# Altium PCB PCB1.PcbDoc (part 6 of 8)
Units mil, origin at the board's own origin, x right, y up, seen from the top; angles counter-clockwise.
Board outline 1968.5 x 1968.5 mil, 4 copper layers (Top Layer, Layer 1, Layer 2, Bottom Layer), stack 23.756 mil thick; 223 components, 143 nets, 652 pads, 329 vias.
Unrouted connection lines stored in the file: 15.
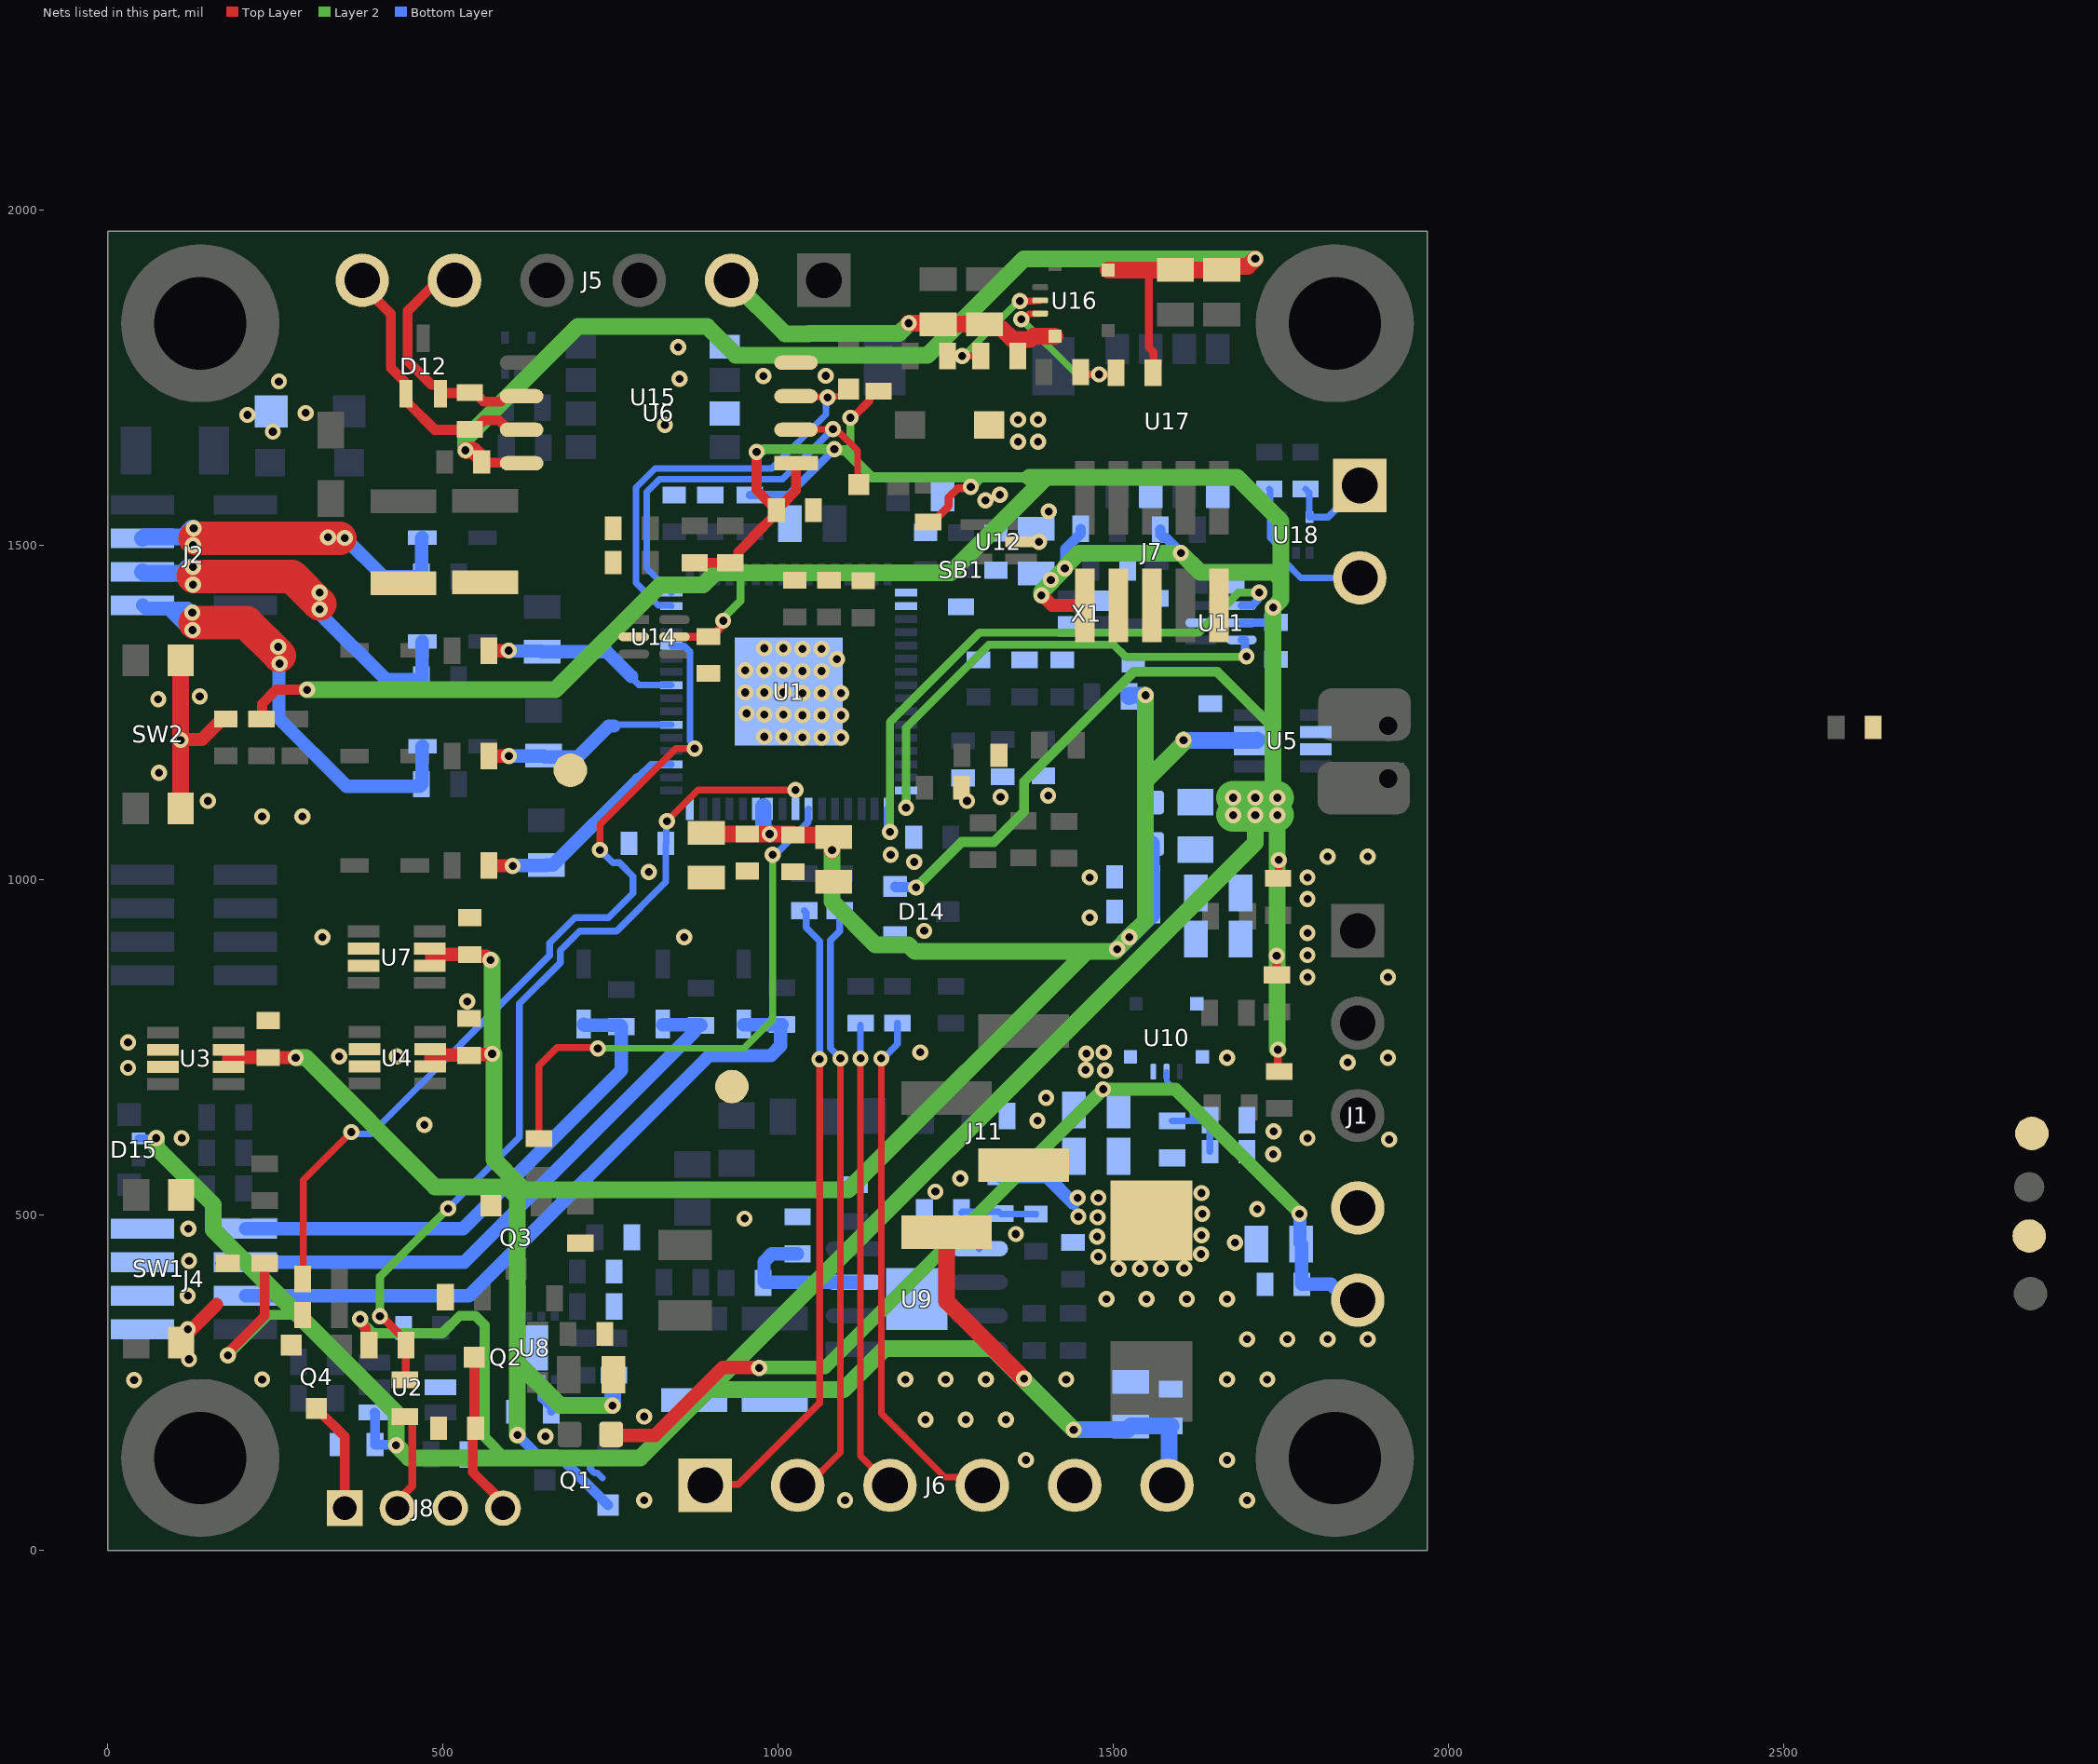
[diagram p4: the nets of this part, all layers, seen from the top]

## Part data (continued)
R47 R48 R49: library part RK73H1JTTD1000F, "Res Thick Film 0603 100 Ohm 1% 0.125W(1/8W) ±100ppm/C Pad SMD Automotive T/R", Arrow Part Number=SR0603FR-7T10KL, Case Code (Imperial)=0603, Case Code (Metric)=1608, Manufacturer="Yageo Group", Manufacturer Lifecycle Status=ACTIVE, Max Operating Temperature=155°C, Max Voltage Rating (DC)=100V, Min Operating Temperature=-55°C, Mouser Part Number=603-SR0603FR-7T10KL, Power Rating=250mW, Ratings=AEC-Q200, Supplier Part Number=YAG5823CT-ND, Temperature Coefficient=100ppm/°C, Tolerance=1%, Voltage Rating=75V, Voltage Rating (DC)=50V, Working Voltage=150V, Arrow Price/Stock=https://www.arrow.com/en/products/sr0603fr-7t10kl/yageo, Case/Package=0603, Category="Chip SMD Resistors", China RoHS=Non-Compliant, ComponentLink1Description=https://datasheet.octopart.com:443/SR0603FR-7T10KL-Yageo-datasheet-176402240.pdf?src-supplier=Farnell, ComponentLink1URL=https://datasheet.octopart.com:443/SR0603FR-7T10KL-Yageo-datasheet-176402240.pdf?src-supplier=Farnell, ComponentLink2Description=https://datasheet.octopart.com:443/SR0603FR-7T10KL-Yageo-datasheet-119732217.pdf?src-supplier=Upverter, ComponentLink2URL=https://datasheet.octopart.com:443/SR0603FR-7T10KL-Yageo-datasheet-119732217.pdf?src-supplier=Upverter, ComponentLink3Description=https://datasheet.octopart.com:443/SR0603FR-7T10KL-Yageo-Group-datasheet-184785656.pdf?src-supplier=Future+Electronics, ComponentLink3URL=https://datasheet.octopart.com:443/SR0603FR-7T10KL-Yageo-Group-datasheet-184785656.pdf?src-supplier=Future+Electronics, ComponentLink4Description=https://datasheet.octopart.com:443/SR0603FR-7T10KL-Yageo-datasheet-155675517.pdf?src-supplier=Future+Electronics, ComponentLink4URL=https://datasheet.octopart.com:443/SR0603FR-7T10KL-Yageo-datasheet-155675517.pdf?src-supplier=Future+Electronics, ComponentLink5Description=https://datasheet.octopart.com:443/SR0603FR-7T10KL-Yageo-datasheet-137701088.pdf?src-supplier=Future+Electronics, ComponentLink5URL=https://datasheet.octopart.com:443/SR0603FR-7T10KL-Yageo-datasheet-137701088.pdf?src-supplier=Future+Electronics, ComponentLink6Description=https://datasheet.octopart.com/SR0603FR-7T10KL-Yageo-datasheet-11047080.pdf, ComponentLink6URL=https://datasheet.octopart.com/SR0603FR-7T10KL-Yageo-datasheet-11047080.pdf, ComponentLink7Description=http://sigma.octopart.com:80/conflict_mineral_statement/Yageo-company-3.pdf?src-supplier=Compliance+Statements, ComponentLink7URL=http://sigma.octopart.com:80/conflict_mineral_statement/Yageo-company-3.pdf?src-supplier=Compliance+Statements, ComponentLink8Description=http://sigma.octopart.com:80/rohs_statement/Yageo-company-2.pdf?src-supplier=Compliance+Statements, ComponentLink8URL=http://sigma.octopart.com:80/rohs_statement/Yageo-company-2.pdf?src-supplier=Compliance+Statements, ComponentLink9Description=https://datasheet.octopart.com:443/SR0603FR-7T4R7L-Yageo-datasheet-176402240.pdf?src-supplier=Farnell, ComponentLink9URL=https://datasheet.octopart.com:443/SR0603FR-7T4R7L-Yageo-datasheet-176402240.pdf?src-supplier=Farnell, ComponentLink10Description=https://datasheet.octopart.com:443/SR0603FR-7T4R7L-Yageo-datasheet-119732217.pdf?src-supplier=Upverter, ComponentLink10URL=https://datasheet.octopart.com:443/SR0603FR-7T4R7L-Yageo-datasheet-119732217.pdf?src-supplier=Upverter, ComponentLink11Description=https://datasheet.octopart.com:443/SR0603FR-7T4R7L-Yageo-Group-datasheet-184785656.pdf?src-supplier=Future+Electronics, ComponentLink11URL=https://datasheet.octopart.com:443/SR0603FR-7T4R7L-Yageo-Group-datasheet-184785656.pdf?src-supplier=Future+Electronics, ComponentLink12Description=https://datasheet.octopart.com:443/SR0603FR-7T4R7L-Yageo-datasheet-155675517.pdf?src-supplier=Future+Electronics, ComponentLink12URL=https://datasheet.octopart.com:443/SR0603FR-7T4R7L-Yageo-datasheet-155675517.pdf?src-supplier=Future+Electronics, ComponentLink13Description=https://datasheet.octopart.com:443/SR0603FR-7T4R7L-Yageo-datasheet-137701088.pdf?src-supplier=Future+Electronics, ComponentLink13URL=https://datasheet.octopart.com:443/SR0603FR-7T4R7L-Yageo-datasheet-137701088.pdf?src-supplier=Future+Electronics, ComponentLink14Description=https://datasheet.octopart.com/SR0603FR-7T4R7L-Yageo-datasheet-11047080.pdf, ComponentLink14URL=https://datasheet.octopart.com/SR0603FR-7T4R7L-Yageo-datasheet-11047080.pdf, ComponentLink15Description=https://datasheet.octopart.com:443/SR0603FR-7T100KL-Yageo-datasheet-176402240.pdf?src-supplier=element14+APAC, ComponentLink15URL=https://datasheet.octopart.com:443/SR0603FR-7T100KL-Yageo-datasheet-176402240.pdf?src-supplier=element14+APAC, ComponentLink16Description=https://datasheet.octopart.com:443/SR0603FR-7T100KL-Yageo-datasheet-119732217.pdf?src-supplier=Upverter, ComponentLink16URL=https://datasheet.octopart.com:443/SR0603FR-7T100KL-Yageo-datasheet-119732217.pdf?src-supplier=Upverter, ComponentLink17Description=https://datasheet.octopart.com:443/SR0603FR-7T100KL-Yageo-Group-datasheet-184785656.pdf?src-supplier=Future+Electronics, ComponentLink17URL=https://datasheet.octopart.com:443/SR0603FR-7T100KL-Yageo-Group-datasheet-184785656.pdf?src-supplier=Future+Electronics, ComponentLink18Description=https://datasheet.octopart.com:443/SR0603FR-7T100KL-Yageo-datasheet-155675517.pdf?src-supplier=Future+Electronics, ComponentLink18URL=https://datasheet.octopart.com:443/SR0603FR-7T100KL-Yageo-datasheet-155675517.pdf?src-supplier=Future+Electronics, ComponentLink19Description=https://datasheet.octopart.com:443/SR0603FR-7T100KL-Yageo-datasheet-137701088.pdf?src-supplier=Future+Electronics, ComponentLink19URL=https://datasheet.octopart.com:443/SR0603FR-7T100KL-Yageo-datasheet-137701088.pdf?src-supplier=Future+Electronics, ComponentLink20Description=https://datasheet.octopart.com/SR0603FR-7T100KL-Yageo-datasheet-11047080.pdf, ComponentLink20URL=https://datasheet.octopart.com/SR0603FR-7T100KL-Yageo-datasheet-11047080.pdf, ComponentLink21Description=https://datasheet.octopart.com:443/RS73F1JTTD2001B-KOA-Speer-datasheet-182143723.pdf?src-supplier=IHS, ComponentLink21URL=https://datasheet.octopart.com:443/RS73F1JTTD2001B-KOA-Speer-datasheet-182143723.pdf?src-supplier=IHS, ComponentLink22Description=https://datasheet.octopart.com:443/RS73F1JTTD2001B-KOA-Speer-datasheet-141350738.pdf?src-supplier=KOA+Speer+SCT, ComponentLink22URL=https://datasheet.octopart.com:443/RS73F1JTTD2001B-KOA-Speer-datasheet-141350738.pdf?src-supplier=KOA+Speer+SCT, ComponentLink23Description=https://sigma.octopart.com:443/141350679/technical_drawing/KOA-Speer-RS73F1JTTD2001B.pdf?src-supplier=KOA+Speer+SCT, ComponentLink23URL=https://sigma.octopart.com:443/141350679/technical_drawing/KOA-Speer-RS73F1JTTD2001B.pdf?src-supplier=KOA+Speer+SCT, ComponentLink24Description=http://sigma.octopart.com:80/rohs_statement/KOA-Speer-company-17.pdf?src-supplier=Compliance+Statements, ComponentLink24URL=http://sigma.octopart.com:80/rohs_statement/KOA-Speer-company-17.pdf?src-supplier=Compliance+Statements, ComponentLink25Description=https://datasheet.octopart.com:443/ERJH3EF2201V-Panasonic-datasheet-182147299.pdf?src-supplier=IHS, ComponentLink25URL=https://datasheet.octopart.com:443/ERJH3EF2201V-Panasonic-datasheet-182147299.pdf?src-supplier=IHS, ComponentLink26Description=https://datasheet.octopart.com:443/ERJH3EF2201V-Panasonic-datasheet-150823776.pdf?src-supplier=Panasonic, ComponentLink26URL=https://datasheet.octopart.com:443/ERJH3EF2201V-Panasonic-datasheet-150823776.pdf?src-supplier=Panasonic, ComponentLink27Description=https://datasheet.octopart.com:443/ERJH3EF2201V-Panasonic-datasheet-165581513.pdf?src-supplier=TME, ComponentLink27URL=https://datasheet.octopart.com:443/ERJH3EF2201V-Panasonic-datasheet-165581513.pdf?src-supplier=TME, ComponentLink28Description=https://datasheet.octopart.com:443/RK73H1JTTD1000F-KOA-Speer-datasheet-181956035.pdf?src-supplier=IHS, ComponentLink28URL=https://datasheet.octopart.com:443/RK73H1JTTD1000F-KOA-Speer-datasheet-181956035.pdf?src-supplier=IHS, ComponentLink29Description=https://datasheet.octopart.com/RK73H1JTTD1000F-KOA-Speer-datasheet-11590619.pdf, ComponentLink29URL=https://datasheet.octopart.com/RK73H1JTTD1000F-KOA-Speer-datasheet-11590619.pdf, ComponentLink30Description=https://sigma.octopart.com:443/138820520/technical_drawing/KOA-Speer-RK73H1JTTD1000F.pdf?src-supplier=Upverter, ComponentLink30URL=https://sigma.octopart.com:443/138820520/technical_drawing/KOA-Speer-RK73H1JTTD1000F.pdf?src-supplier=Upverter, ComponentLink31Description=https://datasheet.octopart.com:443/RK73H1JTTD1000F-KOA-Speer-datasheet-141253609.pdf?src-supplier=Upverter, ComponentLink31URL=https://datasheet.octopart.com:443/RK73H1JTTD1000F-KOA-Speer-datasheet-141253609.pdf?src-supplier=Upverter, ComponentLink32Description=https://datasheet.octopart.com:443/RK73H1JTTD1000F-KOA-Speer-datasheet-141913736.pdf?src-supplier=Upverter, ComponentLink32URL=https://datasheet.octopart.com:443/RK73H1JTTD1000F-KOA-Speer-datasheet-141913736.pdf?src-supplier=Upverter, ComponentLink33Description=https://datasheet.octopart.com:443/RK73H1JTTD1000F-KOA-Speer-datasheet-149653815.pdf?src-supplier=Farnell, ComponentLink33URL=https://datasheet.octopart.com:443/RK73H1JTTD1000F-KOA-Speer-datasheet-149653815.pdf?src-supplier=Farnell, ComponentLink34Description=https://datasheet.octopart.com:443/RK73H1JTTD1000F-KOA-Speer-datasheet-188906116.pdf?src-supplier=TME, ComponentLink34URL=https://datasheet.octopart.com:443/RK73H1JTTD1000F-KOA-Speer-datasheet-188906116.pdf?src-supplier=TME, ComponentLink35Description=https://datasheet.octopart.com:443/RK73H1JTTD1000F-KOA-Speer-datasheet-155997623.pdf?src-supplier=Future+Electronics, ComponentLink35URL=https://datasheet.octopart.com:443/RK73H1JTTD1000F-KOA-Speer-datasheet-155997623.pdf?src-supplier=Future+Electronics, ComponentLink36Description=https://datasheet.octopart.com:443/RK73H1JTTD1000F-KOA-Speer-datasheet-11541643.pdf?src-supplier=Arrow+Electronics, ComponentLink36URL=https://datasheet.octopart.com:443/RK73H1JTTD1000F-KOA-Speer-datasheet-11541643.pdf?src-supplier=Arrow+Electronics, ComponentLink37Description=https://datasheet.octopart.com:443/RK73H1JTTD1000F-KOA-Speer-datasheet-10854116.pdf?src-supplier=element14+APAC, ComponentLink37URL=https://datasheet.octopart.com:443/RK73H1JTTD1000F-KOA-Speer-datasheet-10854116.pdf?src-supplier=element14+APAC, ComponentLink38Description=https://datasheet.octopart.com:443/RK73H1JTTD1000F-KOA-Speer-datasheet-5377369.pdf?src-supplier=Garrett, ComponentLink38URL=https://datasheet.octopart.com:443/RK73H1JTTD1000F-KOA-Speer-datasheet-5377369.pdf?src-supplier=Garrett, ComponentLink39Description=https://datasheet.octopart.com:443/RK73H1JTTD1000F-KOA-Speer-datasheet-5377256.pdf?src-supplier=Garrett, ComponentLink39URL=https://datasheet.octopart.com:443/RK73H1JTTD1000F-KOA-Speer-datasheet-5377256.pdf?src-supplier=Garrett, ComponentLink40Description=https://datasheet.octopart.com:443/RK73H1JTTD1000F-KOA-Speer-datasheet-109233.pdf?src-supplier=Garrett, ComponentLink40URL=https://datasheet.octopart.com:443/RK73H1JTTD1000F-KOA-Speer-datasheet-109233.pdf?src-supplier=Garrett, Composition="Thick Film", Country of Origin="Mainland China, Taiwan", Datasheet Link=https://mouser.componentsearchengine.com/Datasheets/1/SR0603FR-7T10KL.pdf, Depth=800µm, Export Control Classification Number (ECCN) Code=EAR99, Harmonized Tariff Schedule (HTS) Code=8533.21.00.30, Height=0.55mm, Introduction Date=2017-10-02, Lead Free="Lead Free", Length=1.6mm, Lifecycle Status=Production, Manufacturer Part Number=SR0603FR-7T10KL, Manufacturer_Name="Yageo Group", Manufacturer_Part_Number=SR0603FR-7T10KL, Military Standard=Not, Mounting Technology="Surface Mount", Mouser Price/Stock=https://www.mouser.co.uk/ProductDetail/YAGEO/SR0603FR-7T10KL?qs=pfd5qewlna6IurLw3u3uRA%3D%3D, Number of Terminals=2, Packaging="Tape & Reel", Part Series="High Temperature Chip Resistors", Pins=2, Pricing="1=0,67, 10=0,399, 25=0,3376, 50=0,3022, 100=0,2744, 250=0,24612, 500=0,22976, 1000=0,21675 (USD)", REACH SVHC=Yes, RoHS=Compliant, Schedule B="8533210045, 8533210045|8533210045|8533210045|8533210045|8533210045", Stock=5000, Supplier=DigiKey, Termination=SMD/SMT, Width=800µm
R50 R51 R52 R53: library part RK73H1JTTD33R0F, "Res Thick Film 0603 33 Ohm 1% 0.125W(1/8W) ±100ppm/C Pad SMD Automotive T/R", Arrow Part Number=SR0603FR-7T10KL, Case Code (Imperial)=0603, Case Code (Metric)=1608, Manufacturer="Yageo Group", Max Operating Temperature=155°C, Min Operating Temperature=-55°C, Mouser Part Number=603-SR0603FR-7T10KL, Power Rating=250mW, Ratings=AEC-Q200, Supplier Part Number=YAG5823CT-ND, Temperature Coefficient=100ppm/°C, Tolerance=1%, Voltage Rating=75V, Voltage Rating (DC)=50V, Working Voltage=150V, Arrow Price/Stock=https://www.arrow.com/en/products/sr0603fr-7t10kl/yageo, Case/Package=0603, Category="Chip SMD Resistors", China RoHS=Non-Compliant, ComponentLink1Description=https://datasheet.octopart.com:443/SR0603FR-7T10KL-Yageo-datasheet-176402240.pdf?src-supplier=Farnell, ComponentLink1URL=https://datasheet.octopart.com:443/SR0603FR-7T10KL-Yageo-datasheet-176402240.pdf?src-supplier=Farnell, ComponentLink2Description=https://datasheet.octopart.com:443/SR0603FR-7T10KL-Yageo-datasheet-119732217.pdf?src-supplier=Upverter, ComponentLink2URL=https://datasheet.octopart.com:443/SR0603FR-7T10KL-Yageo-datasheet-119732217.pdf?src-supplier=Upverter, ComponentLink3Description=https://datasheet.octopart.com:443/SR0603FR-7T10KL-Yageo-Group-datasheet-184785656.pdf?src-supplier=Future+Electronics, ComponentLink3URL=https://datasheet.octopart.com:443/SR0603FR-7T10KL-Yageo-Group-datasheet-184785656.pdf?src-supplier=Future+Electronics, ComponentLink4Description=https://datasheet.octopart.com:443/SR0603FR-7T10KL-Yageo-datasheet-155675517.pdf?src-supplier=Future+Electronics, ComponentLink4URL=https://datasheet.octopart.com:443/SR0603FR-7T10KL-Yageo-datasheet-155675517.pdf?src-supplier=Future+Electronics, ComponentLink5Description=https://datasheet.octopart.com:443/SR0603FR-7T10KL-Yageo-datasheet-137701088.pdf?src-supplier=Future+Electronics, ComponentLink5URL=https://datasheet.octopart.com:443/SR0603FR-7T10KL-Yageo-datasheet-137701088.pdf?src-supplier=Future+Electronics, ComponentLink6Description=https://datasheet.octopart.com/SR0603FR-7T10KL-Yageo-datasheet-11047080.pdf, ComponentLink6URL=https://datasheet.octopart.com/SR0603FR-7T10KL-Yageo-datasheet-11047080.pdf, ComponentLink7Description=http://sigma.octopart.com:80/conflict_mineral_statement/Yageo-company-3.pdf?src-supplier=Compliance+Statements, ComponentLink7URL=http://sigma.octopart.com:80/conflict_mineral_statement/Yageo-company-3.pdf?src-supplier=Compliance+Statements, ComponentLink8Description=http://sigma.octopart.com:80/rohs_statement/Yageo-company-2.pdf?src-supplier=Compliance+Statements, ComponentLink8URL=http://sigma.octopart.com:80/rohs_statement/Yageo-company-2.pdf?src-supplier=Compliance+Statements, ComponentLink9Description=https://datasheet.octopart.com:443/SR0603FR-7T4R7L-Yageo-datasheet-176402240.pdf?src-supplier=Farnell, ComponentLink9URL=https://datasheet.octopart.com:443/SR0603FR-7T4R7L-Yageo-datasheet-176402240.pdf?src-supplier=Farnell, ComponentLink10Description=https://datasheet.octopart.com:443/SR0603FR-7T4R7L-Yageo-datasheet-119732217.pdf?src-supplier=Upverter, ComponentLink10URL=https://datasheet.octopart.com:443/SR0603FR-7T4R7L-Yageo-datasheet-119732217.pdf?src-supplier=Upverter, ComponentLink11Description=https://datasheet.octopart.com:443/SR0603FR-7T4R7L-Yageo-Group-datasheet-184785656.pdf?src-supplier=Future+Electronics, ComponentLink11URL=https://datasheet.octopart.com:443/SR0603FR-7T4R7L-Yageo-Group-datasheet-184785656.pdf?src-supplier=Future+Electronics, ComponentLink12Description=https://datasheet.octopart.com:443/SR0603FR-7T4R7L-Yageo-datasheet-155675517.pdf?src-supplier=Future+Electronics, ComponentLink12URL=https://datasheet.octopart.com:443/SR0603FR-7T4R7L-Yageo-datasheet-155675517.pdf?src-supplier=Future+Electronics, ComponentLink13Description=https://datasheet.octopart.com:443/SR0603FR-7T4R7L-Yageo-datasheet-137701088.pdf?src-supplier=Future+Electronics, ComponentLink13URL=https://datasheet.octopart.com:443/SR0603FR-7T4R7L-Yageo-datasheet-137701088.pdf?src-supplier=Future+Electronics, ComponentLink14Description=https://datasheet.octopart.com/SR0603FR-7T4R7L-Yageo-datasheet-11047080.pdf, ComponentLink14URL=https://datasheet.octopart.com/SR0603FR-7T4R7L-Yageo-datasheet-11047080.pdf, ComponentLink15Description=https://datasheet.octopart.com:443/SR0603FR-7T100KL-Yageo-datasheet-176402240.pdf?src-supplier=element14+APAC, ComponentLink15URL=https://datasheet.octopart.com:443/SR0603FR-7T100KL-Yageo-datasheet-176402240.pdf?src-supplier=element14+APAC, ComponentLink16Description=https://datasheet.octopart.com:443/SR0603FR-7T100KL-Yageo-datasheet-119732217.pdf?src-supplier=Upverter, ComponentLink16URL=https://datasheet.octopart.com:443/SR0603FR-7T100KL-Yageo-datasheet-119732217.pdf?src-supplier=Upverter, ComponentLink17Description=https://datasheet.octopart.com:443/SR0603FR-7T100KL-Yageo-Group-datasheet-184785656.pdf?src-supplier=Future+Electronics, ComponentLink17URL=https://datasheet.octopart.com:443/SR0603FR-7T100KL-Yageo-Group-datasheet-184785656.pdf?src-supplier=Future+Electronics, ComponentLink18Description=https://datasheet.octopart.com:443/SR0603FR-7T100KL-Yageo-datasheet-155675517.pdf?src-supplier=Future+Electronics, ComponentLink18URL=https://datasheet.octopart.com:443/SR0603FR-7T100KL-Yageo-datasheet-155675517.pdf?src-supplier=Future+Electronics, ComponentLink19Description=https://datasheet.octopart.com:443/SR0603FR-7T100KL-Yageo-datasheet-137701088.pdf?src-supplier=Future+Electronics, ComponentLink19URL=https://datasheet.octopart.com:443/SR0603FR-7T100KL-Yageo-datasheet-137701088.pdf?src-supplier=Future+Electronics, ComponentLink20Description=https://datasheet.octopart.com/SR0603FR-7T100KL-Yageo-datasheet-11047080.pdf, ComponentLink20URL=https://datasheet.octopart.com/SR0603FR-7T100KL-Yageo-datasheet-11047080.pdf, ComponentLink21Description=https://datasheet.octopart.com:443/RK73H1JTTD1001F-KOA-Speer-datasheet-181956035.pdf?src-supplier=IHS, ComponentLink21URL=https://datasheet.octopart.com:443/RK73H1JTTD1001F-KOA-Speer-datasheet-181956035.pdf?src-supplier=IHS, ComponentLink22Description=https://datasheet.octopart.com/RK73H1JTTD1001F-KOA-Speer-datasheet-11590619.pdf, ComponentLink22URL=https://datasheet.octopart.com/RK73H1JTTD1001F-KOA-Speer-datasheet-11590619.pdf, ComponentLink23Description=https://datasheet.octopart.com:443/RK73H1JTTD1001F-KOA-Speer-datasheet-149653815.pdf?src-supplier=element14+APAC, ComponentLink23URL=https://datasheet.octopart.com:443/RK73H1JTTD1001F-KOA-Speer-datasheet-149653815.pdf?src-supplier=element14+APAC, ComponentLink24Description=https://datasheet.octopart.com:443/RK73H1JTTD1001F-KOA-Speer-datasheet-10854116.pdf?src-supplier=element14+APAC, ComponentLink24URL=https://datasheet.octopart.com:443/RK73H1JTTD1001F-KOA-Speer-datasheet-10854116.pdf?src-supplier=element14+APAC, ComponentLink25Description=https://datasheet.octopart.com:443/RK73H1JTTD1001F-KOA-Speer-datasheet-188906116.pdf?src-supplier=TME, ComponentLink25URL=https://datasheet.octopart.com:443/RK73H1JTTD1001F-KOA-Speer-datasheet-188906116.pdf?src-supplier=TME, ComponentLink26Description=https://datasheet.octopart.com:443/RK73H1JTTD1001F-KOA-Speer-datasheet-155997623.pdf?src-supplier=Future+Electronics, ComponentLink26URL=https://datasheet.octopart.com:443/RK73H1JTTD1001F-KOA-Speer-datasheet-155997623.pdf?src-supplier=Future+Electronics, ComponentLink27Description=https://datasheet.octopart.com:443/RK73H1JTTD1001F-KOA-Speer-datasheet-11541643.pdf?src-supplier=Arrow+Electronics, ComponentLink27URL=https://datasheet.octopart.com:443/RK73H1JTTD1001F-KOA-Speer-datasheet-11541643.pdf?src-supplier=Arrow+Electronics, ComponentLink28Description=https://datasheet.octopart.com:443/RK73H1JTTD1001F-KOA-Speer-datasheet-5377369.pdf?src-supplier=Garrett, ComponentLink28URL=https://datasheet.octopart.com:443/RK73H1JTTD1001F-KOA-Speer-datasheet-5377369.pdf?src-supplier=Garrett, ComponentLink29Description=https://datasheet.octopart.com:443/RK73H1JTTD1001F-KOA-Speer-datasheet-5377256.pdf?src-supplier=Garrett, ComponentLink29URL=https://datasheet.octopart.com:443/RK73H1JTTD1001F-KOA-Speer-datasheet-5377256.pdf?src-supplier=Garrett, ComponentLink30Description=https://datasheet.octopart.com:443/RK73H1JTTD1001F-KOA-Speer-datasheet-109233.pdf?src-supplier=Garrett, ComponentLink30URL=https://datasheet.octopart.com:443/RK73H1JTTD1001F-KOA-Speer-datasheet-109233.pdf?src-supplier=Garrett, ComponentLink31Description=https://datasheet.octopart.com:443/RK73H1JTTD1001F-KOA-Speer-datasheet-5313488.pdf?src-supplier=Verical, ComponentLink31URL=https://datasheet.octopart.com:443/RK73H1JTTD1001F-KOA-Speer-datasheet-5313488.pdf?src-supplier=Verical, ComponentLink32Description=http://sigma.octopart.com:80/rohs_statement/KOA-Speer-company-17.pdf?src-supplier=Compliance+Statements, ComponentLink32URL=http://sigma.octopart.com:80/rohs_statement/KOA-Speer-company-17.pdf?src-supplier=Compliance+Statements, ComponentLink33Description=https://datasheet.octopart.com:443/RK73H1JTTD33R0F-KOA-Speer-datasheet-181956035.pdf?src-supplier=IHS, ComponentLink33URL=https://datasheet.octopart.com:443/RK73H1JTTD33R0F-KOA-Speer-datasheet-181956035.pdf?src-supplier=IHS, ComponentLink34Description=https://datasheet.octopart.com:443/RK73H1JTTD33R0F-KOA-Speer-datasheet-11590619.pdf?src-supplier=Upverter, ComponentLink34URL=https://datasheet.octopart.com:443/RK73H1JTTD33R0F-KOA-Speer-datasheet-11590619.pdf?src-supplier=Upverter, ComponentLink35Description=https://datasheet.octopart.com:443/RK73H1JTTD33R0F-KOA-Speer-datasheet-149653815.pdf?src-supplier=element14+APAC, ComponentLink35URL=https://datasheet.octopart.com:443/RK73H1JTTD33R0F-KOA-Speer-datasheet-149653815.pdf?src-supplier=element14+APAC, ComponentLink36Description=https://datasheet.octopart.com:443/RK73H1JTTD33R0F-KOA-Speer-datasheet-10854116.pdf?src-supplier=element14+APAC, ComponentLink36URL=https://datasheet.octopart.com:443/RK73H1JTTD33R0F-KOA-Speer-datasheet-10854116.pdf?src-supplier=element14+APAC, ComponentLink37Description=https://datasheet.octopart.com:443/RK73H1JTTD33R0F-KOA-Speer-datasheet-188906116.pdf?src-supplier=TME, ComponentLink37URL=https://datasheet.octopart.com:443/RK73H1JTTD33R0F-KOA-Speer-datasheet-188906116.pdf?src-supplier=TME, ComponentLink38Description=https://datasheet.octopart.com:443/RK73H1JTTD33R0F-KOA-Speer-datasheet-164280812.pdf?src-supplier=Future+Electronics, ComponentLink38URL=https://datasheet.octopart.com:443/RK73H1JTTD33R0F-KOA-Speer-datasheet-164280812.pdf?src-supplier=Future+Electronics, Composition="Thick Film", Country of Origin="Mainland China, Taiwan", Datasheet Link=https://mouser.componentsearchengine.com/Datasheets/1/SR0603FR-7T10KL.pdf, Depth=800µm, Export Control Classification Number (ECCN) Code=EAR99, Harmonized Tariff Schedule (HTS) Code=8533.21.00.30, Height=0.55mm, Introduction Date=2017-10-02, Lead Free="Lead Free", Length=1.6mm, Lifecycle Status=Production, Manufacturer Part Number=SR0603FR-7T10KL, Manufacturer_Name="Yageo Group", Manufacturer_Part_Number=SR0603FR-7T10KL, Military Standard=Not, Mounting Technology="Surface Mount", Mouser Price/Stock=https://www.mouser.co.uk/ProductDetail/YAGEO/SR0603FR-7T10KL?qs=pfd5qewlna6IurLw3u3uRA%3D%3D, Number of Terminals=2, Packaging="Tape & Reel", Pins=2, Pricing="1=0,67, 10=0,399, 25=0,3376, 50=0,3022, 100=0,2744, 250=0,24612, 500=0,22976, 1000=0,21675 (USD)", REACH SVHC=Yes, RoHS=Compliant, Schedule B="8533210045, 8533210045|8533210045|8533210045|8533210045|8533210045", Stock=5000, Supplier=DigiKey, Termination=SMD/SMT, Width=800µm
R72 R73 R74 R75: library part ERJ-H3EF1802V, "Fixed Resistor, Metal Glaze/thick Film, 0.125W, 18000ohm, 75V, 1% +/-Tol, 100ppm/Cel, Surface Mount, 0603", Arrow Part Number=SR0603FR-7T10KL, Case Code (Imperial)=0603, Case Code (Metric)=1608, Manufacturer="Yageo Group", Manufacturer Lifecycle Status=ACTIVE, Max Operating Temperature=155°C, Max Power Dissipation=125mW, Max Voltage Rating (DC)=150V, Min Operating Temperature=-55°C, Mouser Part Number=603-SR0603FR-7T10KL, Power Rating=250mW, Ratings=AEC-Q200, Supplier Part Number=YAG5823CT-ND, Temperature Coefficient=100ppm/°C, Tolerance=1%, Voltage Rating=75V, Voltage Rating (DC)=50V, Arrow Price/Stock=https://www.arrow.com/en/products/sr0603fr-7t10kl/yageo, Case/Package=0603, Category="Chip SMD Resistors", China RoHS=Non-Compliant, ComponentLink1Description=https://datasheet.octopart.com:443/SR0603FR-7T10KL-Yageo-datasheet-176402240.pdf?src-supplier=Farnell, ComponentLink1URL=https://datasheet.octopart.com:443/SR0603FR-7T10KL-Yageo-datasheet-176402240.pdf?src-supplier=Farnell, ComponentLink2Description=https://datasheet.octopart.com:443/SR0603FR-7T10KL-Yageo-datasheet-119732217.pdf?src-supplier=Upverter, ComponentLink2URL=https://datasheet.octopart.com:443/SR0603FR-7T10KL-Yageo-datasheet-119732217.pdf?src-supplier=Upverter, ComponentLink3Description=https://datasheet.octopart.com:443/SR0603FR-7T10KL-Yageo-Group-datasheet-184785656.pdf?src-supplier=Future+Electronics, ComponentLink3URL=https://datasheet.octopart.com:443/SR0603FR-7T10KL-Yageo-Group-datasheet-184785656.pdf?src-supplier=Future+Electronics, ComponentLink4Description=https://datasheet.octopart.com:443/SR0603FR-7T10KL-Yageo-datasheet-155675517.pdf?src-supplier=Future+Electronics, ComponentLink4URL=https://datasheet.octopart.com:443/SR0603FR-7T10KL-Yageo-datasheet-155675517.pdf?src-supplier=Future+Electronics, ComponentLink5Description=https://datasheet.octopart.com:443/SR0603FR-7T10KL-Yageo-datasheet-137701088.pdf?src-supplier=Future+Electronics, ComponentLink5URL=https://datasheet.octopart.com:443/SR0603FR-7T10KL-Yageo-datasheet-137701088.pdf?src-supplier=Future+Electronics, ComponentLink6Description=https://datasheet.octopart.com/SR0603FR-7T10KL-Yageo-datasheet-11047080.pdf, ComponentLink6URL=https://datasheet.octopart.com/SR0603FR-7T10KL-Yageo-datasheet-11047080.pdf, ComponentLink7Description=http://sigma.octopart.com:80/conflict_mineral_statement/Yageo-company-3.pdf?src-supplier=Compliance+Statements, ComponentLink7URL=http://sigma.octopart.com:80/conflict_mineral_statement/Yageo-company-3.pdf?src-supplier=Compliance+Statements, ComponentLink8Description=http://sigma.octopart.com:80/rohs_statement/Yageo-company-2.pdf?src-supplier=Compliance+Statements, ComponentLink8URL=http://sigma.octopart.com:80/rohs_statement/Yageo-company-2.pdf?src-supplier=Compliance+Statements, ComponentLink9Description=https://datasheet.octopart.com:443/SR0603FR-7T4R7L-Yageo-datasheet-176402240.pdf?src-supplier=Farnell, ComponentLink9URL=https://datasheet.octopart.com:443/SR0603FR-7T4R7L-Yageo-datasheet-176402240.pdf?src-supplier=Farnell, ComponentLink10Description=https://datasheet.octopart.com:443/SR0603FR-7T4R7L-Yageo-datasheet-119732217.pdf?src-supplier=Upverter, ComponentLink10URL=https://datasheet.octopart.com:443/SR0603FR-7T4R7L-Yageo-datasheet-119732217.pdf?src-supplier=Upverter, ComponentLink11Description=https://datasheet.octopart.com:443/SR0603FR-7T4R7L-Yageo-Group-datasheet-184785656.pdf?src-supplier=Future+Electronics, ComponentLink11URL=https://datasheet.octopart.com:443/SR0603FR-7T4R7L-Yageo-Group-datasheet-184785656.pdf?src-supplier=Future+Electronics, ComponentLink12Description=https://datasheet.octopart.com:443/SR0603FR-7T4R7L-Yageo-datasheet-155675517.pdf?src-supplier=Future+Electronics, ComponentLink12URL=https://datasheet.octopart.com:443/SR0603FR-7T4R7L-Yageo-datasheet-155675517.pdf?src-supplier=Future+Electronics, ComponentLink13Description=https://datasheet.octopart.com:443/SR0603FR-7T4R7L-Yageo-datasheet-137701088.pdf?src-supplier=Future+Electronics, ComponentLink13URL=https://datasheet.octopart.com:443/SR0603FR-7T4R7L-Yageo-datasheet-137701088.pdf?src-supplier=Future+Electronics, ComponentLink14Description=https://datasheet.octopart.com/SR0603FR-7T4R7L-Yageo-datasheet-11047080.pdf, ComponentLink14URL=https://datasheet.octopart.com/SR0603FR-7T4R7L-Yageo-datasheet-11047080.pdf, ComponentLink15Description=https://datasheet.octopart.com:443/SG73G1JTTD5102C-KOA-Speer-datasheet-181956059.pdf?src-supplier=IHS, ComponentLink15URL=https://datasheet.octopart.com:443/SG73G1JTTD5102C-KOA-Speer-datasheet-181956059.pdf?src-supplier=IHS, ComponentLink16Description=https://sigma.octopart.com:443/141350679/technical_drawing/KOA-Speer-SG73G1JTTD5102C.pdf?src-supplier=KOA+Speer+SCT, ComponentLink16URL=https://sigma.octopart.com:443/141350679/technical_drawing/KOA-Speer-SG73G1JTTD5102C.pdf?src-supplier=KOA+Speer+SCT, ComponentLink17Description=https://datasheet.octopart.com:443/SG73G1JTTD5102C-KOA-Speer-datasheet-141350755.pdf?src-supplier=KOA+Speer+SCT, ComponentLink17URL=https://datasheet.octopart.com:443/SG73G1JTTD5102C-KOA-Speer-datasheet-141350755.pdf?src-supplier=KOA+Speer+SCT, ComponentLink18Description=http://sigma.octopart.com:80/rohs_statement/KOA-Speer-company-17.pdf?src-supplier=Compliance+Statements, ComponentLink18URL=http://sigma.octopart.com:80/rohs_statement/KOA-Speer-company-17.pdf?src-supplier=Compliance+Statements, ComponentLink19Description=https://datasheet.octopart.com:443/ESR03EZPD5102-ROHM-datasheet-182147624.pdf?src-supplier=IHS, ComponentLink19URL=https://datasheet.octopart.com:443/ESR03EZPD5102-ROHM-datasheet-182147624.pdf?src-supplier=IHS, ComponentLink20Description=https://datasheet.octopart.com:443/RK73H1JTTD68R0F-KOA-Speer-datasheet-181956035.pdf?src-supplier=IHS, ComponentLink20URL=https://datasheet.octopart.com:443/RK73H1JTTD68R0F-KOA-Speer-datasheet-181956035.pdf?src-supplier=IHS, ComponentLink21Description=https://datasheet.octopart.com:443/RK73H1JTTD68R0F-KOA-Speer-datasheet-11590619.pdf?src-supplier=Upverter, ComponentLink21URL=https://datasheet.octopart.com:443/RK73H1JTTD68R0F-KOA-Speer-datasheet-11590619.pdf?src-supplier=Upverter, ComponentLink22Description=https://datasheet.octopart.com:443/RK73H1JTTD68R0F-KOA-Speer-datasheet-149653815.pdf?src-supplier=Newark, ComponentLink22URL=https://datasheet.octopart.com:443/RK73H1JTTD68R0F-KOA-Speer-datasheet-149653815.pdf?src-supplier=Newark, ComponentLink23Description=https://datasheet.octopart.com:443/RK73H1JTTD68R0F-KOA-Speer-datasheet-10854116.pdf?src-supplier=element14+APAC, ComponentLink23URL=https://datasheet.octopart.com:443/RK73H1JTTD68R0F-KOA-Speer-datasheet-10854116.pdf?src-supplier=element14+APAC, ComponentLink24Description=https://datasheet.octopart.com:443/RNCP0603FTD10K0-Stackpole-Electronics-datasheet-182148179.pdf?src-supplier=IHS, ComponentLink24URL=https://datasheet.octopart.com:443/RNCP0603FTD10K0-Stackpole-Electronics-datasheet-182148179.pdf?src-supplier=IHS, ComponentLink25Description=https://datasheet.octopart.com:443/RNCP0603FTD10K0-Stackpole-Electronics-datasheet-141193801.pdf?src-supplier=Upverter, ComponentLink25URL=https://datasheet.octopart.com:443/RNCP0603FTD10K0-Stackpole-Electronics-datasheet-141193801.pdf?src-supplier=Upverter, ComponentLink26Description=https://datasheet.octopart.com:443/RNCP0603FTD10K0-Stackpole-Electronics-datasheet-38896780.pdf?src-supplier=Upverter, ComponentLink26URL=https://datasheet.octopart.com:443/RNCP0603FTD10K0-Stackpole-Electronics-datasheet-38896780.pdf?src-supplier=Upverter, ComponentLink27Description=https://datasheet.octopart.com:443/RNCP0603FTD10K0-Stackpole-Electronics-datasheet-149178200.pdf?src-supplier=Upverter, ComponentLink27URL=https://datasheet.octopart.com:443/RNCP0603FTD10K0-Stackpole-Electronics-datasheet-149178200.pdf?src-supplier=Upverter, ComponentLink28Description=https://datasheet.octopart.com:443/RNCP0603FTD10K0-Stackpole-Electronics-datasheet-33021030.pdf?src-supplier=Future+Electronics, ComponentLink28URL=https://datasheet.octopart.com:443/RNCP0603FTD10K0-Stackpole-Electronics-datasheet-33021030.pdf?src-supplier=Future+Electronics, ComponentLink29Description=http://sigma.octopart.com:80/15942470/materials_sheet/Stackpole-Electronics-RNCP0603FTD10K0.pdf?src-supplier=Compliance+Statements, ComponentLink29URL=http://sigma.octopart.com:80/15942470/materials_sheet/Stackpole-Electronics-RNCP0603FTD10K0.pdf?src-supplier=Compliance+Statements, ComponentLink30Description=http://sigma.octopart.com:80/141158212/rohs_statement/Stackpole-Electronics-RNCP0603FTD10K0.pdf?src-supplier=Compliance+Statements, ComponentLink30URL=http://sigma.octopart.com:80/141158212/rohs_statement/Stackpole-Electronics-RNCP0603FTD10K0.pdf?src-supplier=Compliance+Statements, ComponentLink31Description=http://sigma.octopart.com:80/141158211/reach_statement/Stackpole-Electronics-RNCP0603FTD10K0.pdf?src-supplier=Compliance+Statements, ComponentLink31URL=http://sigma.octopart.com:80/141158211/reach_statement/Stackpole-Electronics-RNCP0603FTD10K0.pdf?src-supplier=Compliance+Statements, ComponentLink32Description=https://datasheet.octopart.com:443/ERJH3EF1802V-Panasonic-datasheet-182147299.pdf?src-supplier=IHS, ComponentLink32URL=https://datasheet.octopart.com:443/ERJH3EF1802V-Panasonic-datasheet-182147299.pdf?src-supplier=IHS, ComponentLink33Description=https://datasheet.octopart.com:443/ERJH3EF1802V-Panasonic-datasheet-150823776.pdf?src-supplier=Panasonic, ComponentLink33URL=https://datasheet.octopart.com:443/ERJH3EF1802V-Panasonic-datasheet-150823776.pdf?src-supplier=Panasonic, ComponentLink34Description=https://datasheet.octopart.com:443/ERJH3EF1802V-Panasonic-datasheet-165581513.pdf?src-supplier=TME, ComponentLink34URL=https://datasheet.octopart.com:443/ERJH3EF1802V-Panasonic-datasheet-165581513.pdf?src-supplier=TME, Composition="Thick Film", Contact Plating=Tin, Country of Origin="Mainland China, Taiwan", Datasheet Link=https://mouser.componentsearchengine.com/Datasheets/1/SR0603FR-7T10KL.pdf, Depth=800µm, Export Control Classification Number (ECCN) Code=EAR99, Features="Anti-Sulfur, Moisture Resistant", Harmonized Tariff Schedule (HTS) Code=8533.21.00.30, Height=0.55mm, Introduction Date=2017-10-02, Lead Free="Lead Free", Length=1.6mm, Lifecycle Status=Production, Manufacturer Part Number=SR0603FR-7T10KL, Manufacturer_Name="Yageo Group", Manufacturer_Part_Number=SR0603FR-7T10KL, Military Standard=Not, Mounting Technology="Surface Mount", Mouser Price/Stock=https://www.mouser.co.uk/ProductDetail/YAGEO/SR0603FR-7T10KL?qs=pfd5qewlna6IurLw3u3uRA%3D%3D, Number of Terminals=2, Number of Terminations=2, Packaging="Tape & Reel", Part Series="High Temperature Chip Resistors", Pricing="1=0,67, 10=0,399, 25=0,3376, 50=0,3022, 100=0,2744, 250=0,24612, 500=0,22976, 1000=0,21675 (USD)", Radiation Hardening=No, REACH SVHC=Yes, RoHS=Compliant, Schedule B="8533210045, 8533210045|8533210045, 8533210045|8533210045|8533210045, 8533210045|8533210045|8533210045|8533210045", Stock=5000, Supplier=DigiKey, Termination=SMD/SMT, Width=800µm, Working Voltage=150V
R76 R77 R82 R83: library part RK73H1JTTD1001F, "Resistor Thick Film 0603 1K Ohm 1% 1/10W ±100ppm/°C SMD Punched Paper Tape and Reel", Arrow Part Number=SR0603FR-7T10KL, Case Code (Imperial)=0603, Case Code (Metric)=1608, Manufacturer="Yageo Group", Max Operating Temperature=155°C, Min Operating Temperature=-55°C, Mouser Part Number=603-SR0603FR-7T10KL, Power Rating=250mW, Ratings=AEC-Q200, Supplier Part Number=YAG5823CT-ND, Temperature Coefficient=100ppm/°C, Tolerance=1%, Voltage Rating=75V, Voltage Rating (DC)=50V, Working Voltage=150V, Arrow Price/Stock=https://www.arrow.com/en/products/sr0603fr-7t10kl/yageo, Case/Package=0603, Category="Chip SMD Resistors", China RoHS=Non-Compliant, ComponentLink1Description=https://datasheet.octopart.com:443/SR0603FR-7T10KL-Yageo-datasheet-176402240.pdf?src-supplier=Farnell, ComponentLink1URL=https://datasheet.octopart.com:443/SR0603FR-7T10KL-Yageo-datasheet-176402240.pdf?src-supplier=Farnell, ComponentLink2Description=https://datasheet.octopart.com:443/SR0603FR-7T10KL-Yageo-datasheet-119732217.pdf?src-supplier=Upverter, ComponentLink2URL=https://datasheet.octopart.com:443/SR0603FR-7T10KL-Yageo-datasheet-119732217.pdf?src-supplier=Upverter, ComponentLink3Description=https://datasheet.octopart.com:443/SR0603FR-7T10KL-Yageo-Group-datasheet-184785656.pdf?src-supplier=Future+Electronics, ComponentLink3URL=https://datasheet.octopart.com:443/SR0603FR-7T10KL-Yageo-Group-datasheet-184785656.pdf?src-supplier=Future+Electronics, ComponentLink4Description=https://datasheet.octopart.com:443/SR0603FR-7T10KL-Yageo-datasheet-155675517.pdf?src-supplier=Future+Electronics, ComponentLink4URL=https://datasheet.octopart.com:443/SR0603FR-7T10KL-Yageo-datasheet-155675517.pdf?src-supplier=Future+Electronics, ComponentLink5Description=https://datasheet.octopart.com:443/SR0603FR-7T10KL-Yageo-datasheet-137701088.pdf?src-supplier=Future+Electronics, ComponentLink5URL=https://datasheet.octopart.com:443/SR0603FR-7T10KL-Yageo-datasheet-137701088.pdf?src-supplier=Future+Electronics, ComponentLink6Description=https://datasheet.octopart.com/SR0603FR-7T10KL-Yageo-datasheet-11047080.pdf, ComponentLink6URL=https://datasheet.octopart.com/SR0603FR-7T10KL-Yageo-datasheet-11047080.pdf, ComponentLink7Description=http://sigma.octopart.com:80/conflict_mineral_statement/Yageo-company-3.pdf?src-supplier=Compliance+Statements, ComponentLink7URL=http://sigma.octopart.com:80/conflict_mineral_statement/Yageo-company-3.pdf?src-supplier=Compliance+Statements, ComponentLink8Description=http://sigma.octopart.com:80/rohs_statement/Yageo-company-2.pdf?src-supplier=Compliance+Statements, ComponentLink8URL=http://sigma.octopart.com:80/rohs_statement/Yageo-company-2.pdf?src-supplier=Compliance+Statements, ComponentLink9Description=https://datasheet.octopart.com:443/SR0603FR-7T4R7L-Yageo-datasheet-176402240.pdf?src-supplier=Farnell, ComponentLink9URL=https://datasheet.octopart.com:443/SR0603FR-7T4R7L-Yageo-datasheet-176402240.pdf?src-supplier=Farnell, ComponentLink10Description=https://datasheet.octopart.com:443/SR0603FR-7T4R7L-Yageo-datasheet-119732217.pdf?src-supplier=Upverter, ComponentLink10URL=https://datasheet.octopart.com:443/SR0603FR-7T4R7L-Yageo-datasheet-119732217.pdf?src-supplier=Upverter, ComponentLink11Description=https://datasheet.octopart.com:443/SR0603FR-7T4R7L-Yageo-Group-datasheet-184785656.pdf?src-supplier=Future+Electronics, ComponentLink11URL=https://datasheet.octopart.com:443/SR0603FR-7T4R7L-Yageo-Group-datasheet-184785656.pdf?src-supplier=Future+Electronics, ComponentLink12Description=https://datasheet.octopart.com:443/SR0603FR-7T4R7L-Yageo-datasheet-155675517.pdf?src-supplier=Future+Electronics, ComponentLink12URL=https://datasheet.octopart.com:443/SR0603FR-7T4R7L-Yageo-datasheet-155675517.pdf?src-supplier=Future+Electronics, ComponentLink13Description=https://datasheet.octopart.com:443/SR0603FR-7T4R7L-Yageo-datasheet-137701088.pdf?src-supplier=Future+Electronics, ComponentLink13URL=https://datasheet.octopart.com:443/SR0603FR-7T4R7L-Yageo-datasheet-137701088.pdf?src-supplier=Future+Electronics, ComponentLink14Description=https://datasheet.octopart.com/SR0603FR-7T4R7L-Yageo-datasheet-11047080.pdf, ComponentLink14URL=https://datasheet.octopart.com/SR0603FR-7T4R7L-Yageo-datasheet-11047080.pdf, ComponentLink15Description=https://datasheet.octopart.com:443/SR0603FR-7T100KL-Yageo-datasheet-176402240.pdf?src-supplier=element14+APAC, ComponentLink15URL=https://datasheet.octopart.com:443/SR0603FR-7T100KL-Yageo-datasheet-176402240.pdf?src-supplier=element14+APAC, ComponentLink16Description=https://datasheet.octopart.com:443/SR0603FR-7T100KL-Yageo-datasheet-119732217.pdf?src-supplier=Upverter, ComponentLink16URL=https://datasheet.octopart.com:443/SR0603FR-7T100KL-Yageo-datasheet-119732217.pdf?src-supplier=Upverter, ComponentLink17Description=https://datasheet.octopart.com:443/SR0603FR-7T100KL-Yageo-Group-datasheet-184785656.pdf?src-supplier=Future+Electronics, ComponentLink17URL=https://datasheet.octopart.com:443/SR0603FR-7T100KL-Yageo-Group-datasheet-184785656.pdf?src-supplier=Future+Electronics, ComponentLink18Description=https://datasheet.octopart.com:443/SR0603FR-7T100KL-Yageo-datasheet-155675517.pdf?src-supplier=Future+Electronics, ComponentLink18URL=https://datasheet.octopart.com:443/SR0603FR-7T100KL-Yageo-datasheet-155675517.pdf?src-supplier=Future+Electronics, ComponentLink19Description=https://datasheet.octopart.com:443/SR0603FR-7T100KL-Yageo-datasheet-137701088.pdf?src-supplier=Future+Electronics, ComponentLink19URL=https://datasheet.octopart.com:443/SR0603FR-7T100KL-Yageo-datasheet-137701088.pdf?src-supplier=Future+Electronics, ComponentLink20Description=https://datasheet.octopart.com/SR0603FR-7T100KL-Yageo-datasheet-11047080.pdf, ComponentLink20URL=https://datasheet.octopart.com/SR0603FR-7T100KL-Yageo-datasheet-11047080.pdf, ComponentLink21Description=https://datasheet.octopart.com:443/RK73H1JTTD1001F-KOA-Speer-datasheet-181956035.pdf?src-supplier=IHS, ComponentLink21URL=https://datasheet.octopart.com:443/RK73H1JTTD1001F-KOA-Speer-datasheet-181956035.pdf?src-supplier=IHS, ComponentLink22Description=https://datasheet.octopart.com/RK73H1JTTD1001F-KOA-Speer-datasheet-11590619.pdf, ComponentLink22URL=https://datasheet.octopart.com/RK73H1JTTD1001F-KOA-Speer-datasheet-11590619.pdf, ComponentLink23Description=https://datasheet.octopart.com:443/RK73H1JTTD1001F-KOA-Speer-datasheet-149653815.pdf?src-supplier=element14+APAC, ComponentLink23URL=https://datasheet.octopart.com:443/RK73H1JTTD1001F-KOA-Speer-datasheet-149653815.pdf?src-supplier=element14+APAC, ComponentLink24Description=https://datasheet.octopart.com:443/RK73H1JTTD1001F-KOA-Speer-datasheet-10854116.pdf?src-supplier=element14+APAC, ComponentLink24URL=https://datasheet.octopart.com:443/RK73H1JTTD1001F-KOA-Speer-datasheet-10854116.pdf?src-supplier=element14+APAC, ComponentLink25Description=https://datasheet.octopart.com:443/RK73H1JTTD1001F-KOA-Speer-datasheet-188906116.pdf?src-supplier=TME, ComponentLink25URL=https://datasheet.octopart.com:443/RK73H1JTTD1001F-KOA-Speer-datasheet-188906116.pdf?src-supplier=TME, ComponentLink26Description=https://datasheet.octopart.com:443/RK73H1JTTD1001F-KOA-Speer-datasheet-155997623.pdf?src-supplier=Future+Electronics, ComponentLink26URL=https://datasheet.octopart.com:443/RK73H1JTTD1001F-KOA-Speer-datasheet-155997623.pdf?src-supplier=Future+Electronics, ComponentLink27Description=https://datasheet.octopart.com:443/RK73H1JTTD1001F-KOA-Speer-datasheet-11541643.pdf?src-supplier=Arrow+Electronics, ComponentLink27URL=https://datasheet.octopart.com:443/RK73H1JTTD1001F-KOA-Speer-datasheet-11541643.pdf?src-supplier=Arrow+Electronics, ComponentLink28Description=https://datasheet.octopart.com:443/RK73H1JTTD1001F-KOA-Speer-datasheet-5377369.pdf?src-supplier=Garrett, ComponentLink28URL=https://datasheet.octopart.com:443/RK73H1JTTD1001F-KOA-Speer-datasheet-5377369.pdf?src-supplier=Garrett, ComponentLink29Description=https://datasheet.octopart.com:443/RK73H1JTTD1001F-KOA-Speer-datasheet-5377256.pdf?src-supplier=Garrett, ComponentLink29URL=https://datasheet.octopart.com:443/RK73H1JTTD1001F-KOA-Speer-datasheet-5377256.pdf?src-supplier=Garrett, ComponentLink30Description=https://datasheet.octopart.com:443/RK73H1JTTD1001F-KOA-Speer-datasheet-109233.pdf?src-supplier=Garrett, ComponentLink30URL=https://datasheet.octopart.com:443/RK73H1JTTD1001F-KOA-Speer-datasheet-109233.pdf?src-supplier=Garrett, ComponentLink31Description=https://datasheet.octopart.com:443/RK73H1JTTD1001F-KOA-Speer-datasheet-5313488.pdf?src-supplier=Verical, ComponentLink31URL=https://datasheet.octopart.com:443/RK73H1JTTD1001F-KOA-Speer-datasheet-5313488.pdf?src-supplier=Verical, ComponentLink32Description=http://sigma.octopart.com:80/rohs_statement/KOA-Speer-company-17.pdf?src-supplier=Compliance+Statements, ComponentLink32URL=http://sigma.octopart.com:80/rohs_statement/KOA-Speer-company-17.pdf?src-supplier=Compliance+Statements, Composition="Thick Film", Country of Origin="Mainland China, Taiwan", Datasheet Link=https://mouser.componentsearchengine.com/Datasheets/1/SR0603FR-7T10KL.pdf, Depth=800µm, Export Control Classification Number (ECCN) Code=EAR99, Harmonized Tariff Schedule (HTS) Code=8533.21.00.30, Height=0.55mm, Introduction Date=2017-10-02, Lead Free="Lead Free", Length=1.6mm, Lifecycle Status=Production, Manufacturer Part Number=SR0603FR-7T10KL, Manufacturer_Name="Yageo Group", Manufacturer_Part_Number=SR0603FR-7T10KL, Military Standard=Not, Mounting Technology="Surface Mount", Mouser Price/Stock=https://www.mouser.co.uk/ProductDetail/YAGEO/SR0603FR-7T10KL?qs=pfd5qewlna6IurLw3u3uRA%3D%3D, Number of Terminals=2, Packaging="Tape & Reel", Pins=2, Pricing="1=0,67, 10=0,399, 25=0,3376, 50=0,3022, 100=0,2744, 250=0,24612, 500=0,22976, 1000=0,21675 (USD)", REACH SVHC=Yes, RoHS=Compliant, Schedule B="8533210045, 8533210045|8533210045|8533210045|8533210045|8533210045", Stock=5000, Supplier=DigiKey, Termination=SMD/SMT, Width=800µm
SW1 SW2: library part CMP-1461-00002-5, "Switch Tactile N.O. SPST Rectangular Button Gull Wing 0.05A 12VDC 200000Cycles 1.57N SMD T/R", Contact Current Rating=50mA, Contact Resistance=100mΩ, Insulation Resistance=100MΩ, Max Operating Temperature=85°C, Min Operating Temperature=-40°C, Operating Force=1.6N, Voltage Rating=12V, Contact Plating=Silver, Current Rating=50mA, Height=1.65mm, Life (Cycles)=200kcycles, Mount="Surface Mount", Packaging="Tape and Reel", RoHS=Compliant, Voltage Rating (DC)=12V, Width=4.7mm
TP1 TP2 TP4 TP5 TP6: library part TestPoint, "Standard test point 1mm"
TP3: library part TestPoint45, "Standard test point 50mil"
U1: "Integrated Circuit", Manufacturer_Name=STMicroelectronics, Mouser Part Number=511-STSPIN32G4, Arrow Part Number=STSPIN32G4, Arrow Price/Stock=https://www.arrow.com/en/products/stspin32g4/stmicroelectronics.html?utm_currency=USD&region=nac, Datasheet Link=https://www.st.com/resource/en/datasheet/stspin32g4.pdf, Height=1mm, Manufacturer_Part_Number=STSPIN32G4, Mouser Price/Stock=https://www.mouser.co.uk/ProductDetail/STMicroelectronics/STSPIN32G4?qs=DRkmTr78QAT8JT82Qbof2g%3D%3D
U2: "Integrated Circuit", Manufacturer_Name=STMicroelectronics, Mouser Part Number=511-PM8851D, Arrow Part Number=PM8851D, Arrow Price/Stock=https://www.arrow.com/en/products/pm8851d/stmicroelectronics?utm_currency=USD&region=europe, Datasheet Link=https://www.st.com/resource/en/datasheet/pm8851.pdf, Height=1.45mm, Manufacturer_Part_Number=PM8851D, Mouser Price/Stock=https://www.mouser.co.uk/ProductDetail/STMicroelectronics/PM8851D?qs=WHlX%252B%252B9%2FRwBtUBZTIUM2qQ%3D%3D
U3 U4 U5 U7: library part INA241A3IDDFR, "Integrated Circuit", Manufacturer_Name="Texas Instruments", Mouser Part Number=595-INA241A3IDDFR, Arrow Part Number=INA241A3IDDFR, Arrow Price/Stock=https://www.arrow.com/en/products/ina241a3iddfr/texas-instruments?utm_currency=USD&region=nac, Datasheet Link=https://www.ti.com/lit/ds/symlink/ina241a.pdf?ts=1700994119914&ref_url=https%253A%252F%252Fwww.ti.com%252Fproduct%252FINA241A%253FkeyMatch%253DINA241A3IDDFR%2526tisearch%253Dsearch-everything%2526usecase%253DOPN-ALT, Height=1.1mm, Manufacturer_Part_Number=INA241A3IDDFR, Mouser Price/Stock=https://www.mouser.co.uk/ProductDetail/Texas-Instruments/INA241A3IDDFR?qs=IPgv5n7u5QbnUHvSWsi3EA%3D%3D
U6: library part CMP-04872-000236-1, "IC TXRX/ISO FULL 1/1 8SOIC", Case/Package=SOIC, Max Operating Temperature=125°C, Min Operating Temperature=-40°C, Data Rate=5Mbps, Mount="Surface Mount", Receiver Hysteresis=125mV, RoHS Compliant=Yes, Series="Automotive, AEC-Q100", Simplex/Duplex="Full Duplex"
U8: "Integrated Circuit", Manufacturer_Name=STMicroelectronics, Mouser Part Number=511-TS3011IYQ3T, Arrow Part Number=TS3011IYQ3T, Arrow Price/Stock=https://www.arrow.com/en/products/ts3011iyq3t/stmicroelectronics?utm_currency=USD&region=nac, Datasheet Link=https://www.st.com/resource/en/datasheet/ts3011.pdf, Height=0.8mm, Manufacturer_Part_Number=TS3011IYQ3T, Mouser Price/Stock=https://www.mouser.co.uk/ProductDetail/STMicroelectronics/TS3011IYQ3T?qs=qSfuJ%252Bfl%2Fd44zMkM7Ep99A%3D%3D
U9: library part CMP-04918-000331-1, "POWER MANAGEMENT", RoHS Compliant=Yes